# Altium PCB John_Main.PcbDoc (part 3 of 4)
Units mil, origin at the board's own origin, x right, y up, seen from the top; angles counter-clockwise.
Board outline 3346 x 2756 mil, 2 copper layers (Top Layer, Bottom Layer), stack 57 mil thick; 275 components, 161 nets, 721 pads, 395 vias.
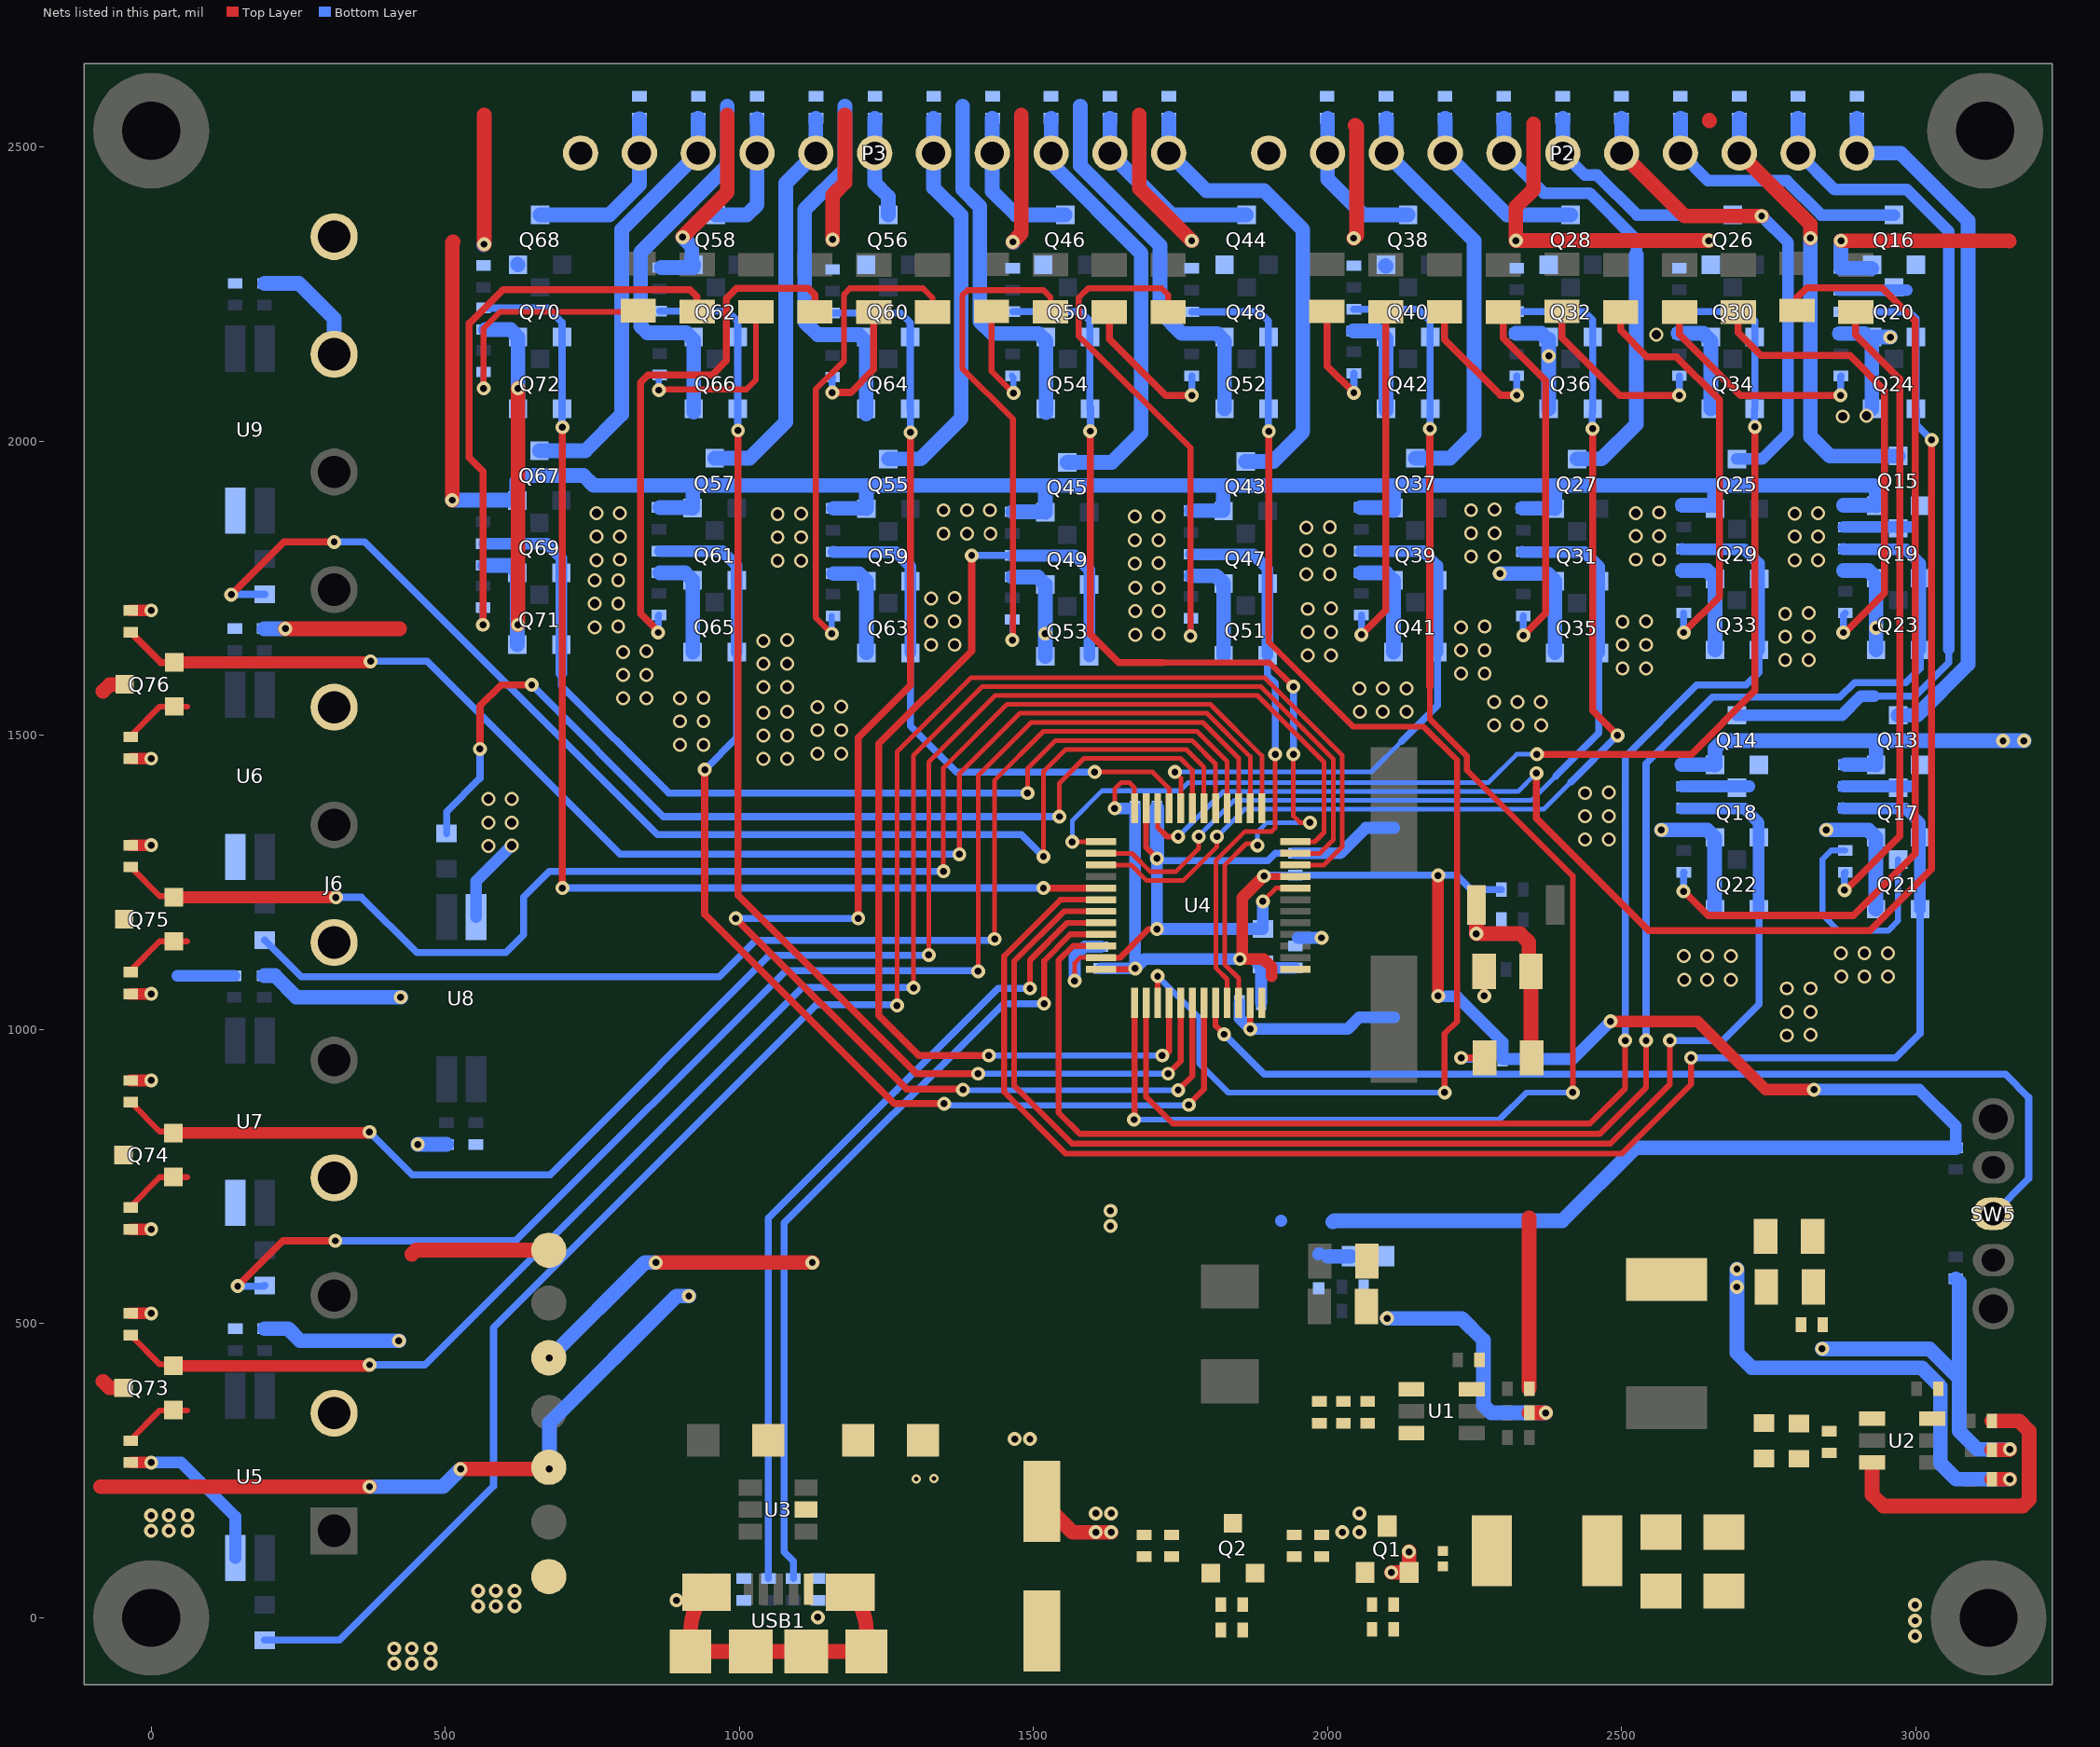
[diagram p2: the nets of this part, all layers, seen from the top]

## Part data (continued)
U3: "TVS DIODE 5VWM 10VC 6TSOP", Breakdown Voltage=7.5V, Case/Package=TSOP, Clamping Voltage=12V, LCSC Part Number=C393373, Leakage Current=1µA, MANUFACTURER=onsemi, Manufacturer Lifecycle Status=ACTIVE, Max Operating Temperature=125°C, Max Surge Current=19A, Min Breakdown Voltage=6V, Min Operating Temperature=-40°C, Operating Supply Voltage=5V, Peak Pulse Current=8A, Power Line Protection=Yes, Test Current=1mA, China RoHS=Compliant, ComponentLink1Description=https://datasheet.octopart.com:443/NUP2114UCMR6T1G-onsemi-datasheet-180968601.pdf?src-supplier=IHS, ComponentLink1URL=https://datasheet.octopart.com:443/NUP2114UCMR6T1G-onsemi-datasheet-180968601.pdf?src-supplier=IHS, ComponentLink2Description=https://datasheet.octopart.com:443/NUP2114UCMR6T1G-ON-Semiconductor-datasheet-139013348.pdf?src-supplier=Upverter, ComponentLink2URL=https://datasheet.octopart.com:443/NUP2114UCMR6T1G-ON-Semiconductor-datasheet-139013348.pdf?src-supplier=Upverter, ComponentLink3Description=https://datasheet.octopart.com:443/NUP2114UCMR6T1G-ON-Semiconductor-datasheet-12517220.pdf?src-supplier=JRH+Electronics, ComponentLink3URL=https://datasheet.octopart.com:443/NUP2114UCMR6T1G-ON-Semiconductor-datasheet-12517220.pdf?src-supplier=JRH+Electronics, ComponentLink4Description=https://datasheet.octopart.com:443/NUP2114UCMR6T1G-ON-Semiconductor-datasheet-93402670.pdf?src-supplier=Newark, ComponentLink4URL=https://datasheet.octopart.com:443/NUP2114UCMR6T1G-ON-Semiconductor-datasheet-93402670.pdf?src-supplier=Newark, ComponentLink5Description=https://datasheet.octopart.com:443/NUP2114UCMR6T1G-ON-Semiconductor-datasheet-11781058.pdf?src-supplier=Arrow+Electronics, ComponentLink5URL=https://datasheet.octopart.com:443/NUP2114UCMR6T1G-ON-Semiconductor-datasheet-11781058.pdf?src-supplier=Arrow+Electronics, ComponentLink6Description=http://sigma.octopart.com:80/15540786/rohs_certificate/ON-Semiconductor-NUP2114UCMR6T1G.pdf?src-supplier=Compliance+Statements, ComponentLink6URL=http://sigma.octopart.com:80/15540786/rohs_certificate/ON-Semiconductor-NUP2114UCMR6T1G.pdf?src-supplier=Compliance+Statements, ComponentLink7Description=http://sigma.octopart.com:80/15684254/materials_sheet/ON-Semiconductor-NUP2114UCMR6T1G.csv?src-supplier=Compliance+Statements, ComponentLink7URL=http://sigma.octopart.com:80/15684254/materials_sheet/ON-Semiconductor-NUP2114UCMR6T1G.csv?src-supplier=Compliance+Statements, ComponentLink8Description=http://sigma.octopart.com:80/150629776/rohs_statement/ON-Semiconductor-NUP2114UCMR6T1G.pdf?src-supplier=Compliance+Statements, ComponentLink8URL=http://sigma.octopart.com:80/150629776/rohs_statement/ON-Semiconductor-NUP2114UCMR6T1G.pdf?src-supplier=Compliance+Statements, ComponentLink9Description=http://sigma.octopart.com:80/reach_statement/ON-Semiconductor-company-79.pdf?src-supplier=Compliance+Statements, ComponentLink9URL=http://sigma.octopart.com:80/reach_statement/ON-Semiconductor-company-79.pdf?src-supplier=Compliance+Statements, ComponentLink10Description=https://octopart.com:443/opatz8j6/c1?t=WHQR9uYdgpzj_1pscu76jQl6SgdNYEFCsB45f32wZZoFxCsQNnTKjjNsMYmP8-tNAzH3PllWfDzCrm21sm3O0yX6Z-53NNC5eFJr5XbJGHdORXd5PF3OOo3CImUBKNeQS3HmN9uPOWjBWXFdunIc45LQOJ5gn3633PacQX-_VlsFFggQuFkNQdU_reWhDfM_aJjhbu9NdAkiBle4rEQKmYnaoI-ZpXvRqCCi0hGZ9pE0dY1iMvStjDVJm3RbKYgavDmI8RSqtgWwHOO5VIrlYvErgV0U4ccu7WiifKCK2DwQWrnPYcBzCgFR9XOWz9r3-48fB14U1Lqb5JaFbo5XHNFFjMaufSDK6ZmMxG1n87oH0pc&src-supplier=Compliance+Statements, ComponentLink10URL=https://octopart.com:443/opatz8j6/c1?t=WHQR9uYdgpzj_1pscu76jQl6SgdNYEFCsB45f32wZZoFxCsQNnTKjjNsMYmP8-tNAzH3PllWfDzCrm21sm3O0yX6Z-53NNC5eFJr5XbJGHdORXd5PF3OOo3CImUBKNeQS3HmN9uPOWjBWXFdunIc45LQOJ5gn3633PacQX-_VlsFFggQuFkNQdU_reWhDfM_aJjhbu9NdAkiBle4rEQKmYnaoI-ZpXvRqCCi0hGZ9pE0dY1iMvStjDVJm3RbKYgavDmI8RSqtgWwHOO5VIrlYvErgV0U4ccu7WiifKCK2DwQWrnPYcBzCgFR9XOWz9r3-48fB14U1Lqb5JaFbo5XHNFFjMaufSDK6ZmMxG1n87oH0pc&src-supplier=Compliance+Statements, ComponentLink11Description=https://octopart.com:443/opatz8j6/c1?t=VqVTyc6VXqTBoXsnuoG7LjY3mp2KX-eKzPIkg7aySNunBFpm0IQnkmc826qVFZhglS6vaf-VvqwaWaROfS_iErSVq9YUUuVgokCDv5Vhxq2pu1cn-vrRw1TlcFDaGbodQB-atNY6UP6gD2sOO8NRAoQTemD37mLChF1Rt1bpz95WWhJ_wI0XqbdDN8V1Apvbq8ufNLXwMMdHk5jYglIDCz4WpJf5DoTt1BP_MBv-tXAye_NcKa095654jMt3sjm_6RuC2vVrkcCpfXNjjgvjYPsYUvKBiXeM6Xjzw9honyCE0JlgCVT7WXyyf_6oP9kIrOXlSICGvfIO1US9YbBHujA-CLkGpoYI906K6Xw-TlpUog&src-supplier=Compliance+Statements, ComponentLink11URL=https://octopart.com:443/opatz8j6/c1?t=VqVTyc6VXqTBoXsnuoG7LjY3mp2KX-eKzPIkg7aySNunBFpm0IQnkmc826qVFZhglS6vaf-VvqwaWaROfS_iErSVq9YUUuVgokCDv5Vhxq2pu1cn-vrRw1TlcFDaGbodQB-atNY6UP6gD2sOO8NRAoQTemD37mLChF1Rt1bpz95WWhJ_wI0XqbdDN8V1Apvbq8ufNLXwMMdHk5jYglIDCz4WpJf5DoTt1BP_MBv-tXAye_NcKa095654jMt3sjm_6RuC2vVrkcCpfXNjjgvjYPsYUvKBiXeM6Xjzw9honyCE0JlgCVT7WXyyf_6oP9kIrOXlSICGvfIO1US9YbBHujA-CLkGpoYI906K6Xw-TlpUog&src-supplier=Compliance+Statements, Contact Plating=Tin, Depth=1.5mm, Direction=Unidirectional, Element Configuration=Single, ESD Protection=Yes, Halogen Free="Halogen Free", Height=1mm, Item Type="TVS Diodes", Lead Free="Lead Free", Length=3mm, Lifecycle Status=Production, Manufacturer Part Number=NUP2114UCMR6T1G, Max Breakdown Voltage=7.5V, Max Reverse Leakage Current=1µA, Number of Bidirectional Channels=2, Number of Channels=1, Number of Elements=1, Number of Lines=2, Number of Terminals=6, Packaging="Tape and Reel", Peak Reverse Current=1µA, Pins=6, Polarity=Unidirectional, Pricing="1=0.81, 10=0.5, 100=0.3234, 500=0.24708, 1000=0.22246 (USD)", Radiation Hardening=No, REACH SVHC=Yes, Reverse Standoff Voltage=5V, RoHS=Compliant, Schedule B="8536300000, 8536300000|8536300000|8536300000|8536300000|8536300000|8536300000|8536300000|8536300000|8536300000|8536300000|8536300000|8536300000|8536300000|8536300000|8536300000|8536300000|8536300000|8536300000|8536300000|8536300000|8536300000|8536300000|8536300000|85", Stock=34630, Supplier=DigiKey, Width=1.7mm, Working Voltage=5V
U4: "IC MCU 32BIT 128KB FLASH 48LQFP"
U5 U6 U7 U8 U9: "TransistorOptocouplers DC 1 2500Vrms SOP-4_P1.27 Optocouplers RoHS", Case/Package=SOIC, Collector Emitter Saturation Voltage=300mV, Forward Voltage=1.2V, MANUFACTURER=CEL, Max Collector Current=30mA, Max Operating Temperature=100°C, Max Output Voltage=80V, Max Power Dissipation=120mW, Min Operating Temperature=-55°C, Package Quantity=1, Supplier Part Number 1=PS2801C-1-F3-ACT-ND, Collector Emitter Voltage (VCEO)=300mV, ComponentLink1Description=http://www.cel.com/pdf/datasheets/PS2801C-1,PS2801C-4.pdf?src-supplier=Digi-Key, ComponentLink1URL=http://www.cel.com/pdf/datasheets/PS2801C-1,PS2801C-4.pdf?src-supplier=Digi-Key, ComponentLink2Description=http://www.cel.com/pdf/datasheets/how_to_order_optos.pdf?src-supplier=Digi-Key, ComponentLink2URL=http://www.cel.com/pdf/datasheets/how_to_order_optos.pdf?src-supplier=Digi-Key, ComponentLink3Description=http://datasheet.iiic.cc/cel/PS2801C-1-F3-A.pdf?src-supplier=IIIC, ComponentLink3URL=http://datasheet.iiic.cc/cel/PS2801C-1-F3-A.pdf?src-supplier=IIIC, Lead Free="Lead Free", Manufacturer Part Number=PS2801C-1-F3-A, Mount="Surface Mount", Number of Channels=1, Number of Pins=4, Output Current per Channel=30mA, Packaging="Tape and Reel", Pricing 1="1=0.77, 10=0.595, 100=0.3825 (USD)", Stock 1=399, Supplier 1=Digi-Key
USB1: library part "Micro Usb Conn SMD", "CONN USB MICRO B RECPT SMT R/A", Colour=Black, Current Rating=1.8A, Flammability Rating="UL94 V-0", Insulation Resistance=1GR, MANUFACTURER="Amphenol FCI", Max Operating Temperature=85°C, Max Voltage Rating (AC)=100V, Min Operating Temperature=-55°C, Package Quantity=1400, Supplier Part Number 1=609-4613-1-ND, ComponentLink1Description=https://datasheet.ciiva.com/26853/getdatasheetpartid-418041-26853891.pdf, ComponentLink1URL=https://datasheet.ciiva.com/26853/getdatasheetpartid-418041-26853891.pdf, ComponentLink2Description=https://datasheet.ciiva.com/851/10118192-851112.pdf, ComponentLink2URL=https://datasheet.ciiva.com/851/10118192-851112.pdf, ComponentLink3Description=https://datasheet.ciiva.com/4598/10118192ac-197249-4598796.pdf, ComponentLink3URL=https://datasheet.ciiva.com/4598/10118192ac-197249-4598796.pdf, Connector Type=USB,Receptacle, Contact Material="Copper Alloy", Contact Plating=Nickel,Gold, Depth=5.57mm, Gender=Receptacle, Housing Material=Polymer, Lead Free="Lead Free", Length=7.86mm, Manufacturer Part Number=10118192-0001LF, Mount="Surface Mount,Horizontal", Number of Contacts=5, Number of Ports=1, Number of Terminals=5, Orientation="Right Angle", Packaging="Tape and Reel", Pitch=0.65mm, Pricing 1="1=0.42, 10=0.393, 25=0.3536, 50=0.3144, 100=0.3013, 250=0.2751, 500=0.262 (USD)", Radiation Hardening=No, REACH SVHC="No SVHC", Stock 1=203283, Supplier 1=Digi-Key, Termination=Solder, USB Standard="USB 2.0", Voltage Rating=100V
X1: "8MHz ±20ppm 20pF SMD,12.5x4.5mm SMD Crystal Resonators RoHS", MANUFACTURER="Suzhou Liming Elec", Package=Custom, Manufacturer Part No=49MD-8.000-20-20-20/A
J1 J2 J3 J4 J5 J7 J8: LatestRevisionDate=17-Jul-2002, LatestRevisionNote="Re-released for DXP Platform.", Publisher="Altium Limited"

## Free pads (board coordinates)
  round 196.85 hole 98.43: MH(0,2528) MH(0,0) MH(3118,2528) MH(3124,0)

## Via types
v1: diameter 23.62, hole 11.81, Top Layer to Bottom Layer, tented both sides, 228 vias
v2: diameter 23.62, hole 15.75, Top Layer to Bottom Layer, tented both sides, 165 vias
v3: diameter 15.75, hole 7.87, Top Layer to Bottom Layer, 2 vias

## Nets (pads, with @x,y where several pads share a name; then routed paths per layer and width w, separated by ;. In a path a pad name is that pad's centre, name@x,y a point inside that pad or via, vN(x,y) a via of type N, cw(c..) or ccw(c..) an arc to the next point about the centre after c; other vN are vias at no path point)
5V: CF6.1 CF7.1 CF8.1 D1.A LF1.2 Q13.2 Q14.2 Q15.2 Q16.2 Q25.2 Q26.2 Q27.2 Q28.2 Q37.2 Q38.2 Q43.2 Q44.2 Q45.2 Q46.2 Q55.2 Q56.2 Q57.2 Q58.2 Q67.2 Q68.2 R59.2 R60.2 R61.2 R62.2 R71.2 R72.2 R73.2 R74.2 R83.2 R84.2 R90.2 R91.2 R92.2 R93.2 R102.2 R103.2 R104.2 R105.2 R114.2 R115.2 RF2.1 | length 7554.3
  Top Layer w25: v1(511.78,1900) 511.78,2337.78 513,2339 ; v1(566,2335) 566,2555 ; v1(903.48,2347.23) 979.5,2423.25 979.5,2555 ; v1(1158.49,2343) 1158.49,2418.49 1179.5,2439.5 1179.5,2555 ; v1(1465,2339) 1479.5,2353.5 1479.5,2555 ; 1680,2555 1680,2430 v1(1769,2341) ; v1(2044.56,2345.32) 2049.5,2350.27 2049.5,2534.5 2047,2537 ; 2350,2540 2350,2428.19 2320.19,2398.38 v1(2320.19,2341.32) v1(2648.05,2341.32) ; 2649,2546 2649,2545.55 2649.5,2545.05 ; v1(2872.78,2341) 3158,2341 3159,2340 ; RF2.1@3129.45,235.68 v1(3159.94,235.68)
  Bottom Layer w25: v1@511.78,1900.18 R114.2@564.37,1900.18 ; v1@565.09,2334.09 v1(566,2335) ; R114.2@566.99,1900.18 621.78,1900.18 621.78,1932.68 631.09,1942 735,1942 752,1925 924,1925 ; Q68.2@622.87,2301 Q68.2@623.69,2300.18 ; R104.2@865,1887.5 919.78,1887.5 Q57.2@920.6,1886.68 920.6,1921.6 924,1925 ; R105.2@866.76,2295.5 Q58.2@921.54,2295.5 ; v1(903.48,2347.23) 919.11,2331.59 919.11,2303.43 Q58.2@922.36,2300.18 ; R102.2@1160.43,1886.18 1215.21,1886.18 Q55.2@1216.03,1885.36 1216.03,1920.97 1212,1925 ; R92.2@1464.52,1880.26 1519.3,1880.26 Q45.2@1520.12,1879.44 1520.12,1922.12 1523,1925 ; v1(1465,2339) v1@1465.61,2338.39 ; R90.2@1767.61,1882.17 R90.2@1767.96,1882.17 1822.39,1882.17 1822.39,1925 ; v1(1769,2341) v1@1769.17,2340.83 ; R83.2@2056.45,1887.5 R83.2@2057.55,1887.5 2111.23,1887.5 Q37.2@2112.06,1886.67 ; Q38.2@2098.78,2298.5 Q38.2@2099.6,2297.67 ; Q37.2@2112.23,1882.5 2112.23,1920.97 ; R73.2@2330.99,1886.18 R73.2@2332.83,1886.18 2385.78,1886.18 Q27.2@2386.6,1885.35 ; Q27.2@2386.03,1887.36 2386.03,1922.97 ; R60.2@2602.49,1450.5 R60.2@2605.58,1450.5 2657.27,1450.5 Q14.2@2658.09,1449.67 ; R71.2@2602.99,1891.18 R71.2@2605.58,1891.18 2658.12,1891.18 2658.12,1924.12 ; Q14.2@2658.6,1449.67 2658.6,1477.54 2672.06,1491 2936,1491 ; 2696.01,450.44 v1(2696.01,592.77) ; 2697.69,448.73 2721.42,425 3010.44,425 3041.94,393.5 3041.94,262.5 3068.76,235.68 v1(3159.94,235.68) ; v1@2872.95,2340.84 R62.2@2872.95,2294.18 2924.78,2294.18 Q16.2@2925.6,2293.35 ; R61.2@2876.99,1891.18 R61.2@2880.32,1891.18 2931.78,1891.18 Q15.2@2932.6,1890.35 2932.6,1920.4 2928,1925 2095.14,1925 1822.39,1925 ; R59.2@2880.32,1450.5 2931.27,1450.5 Q13.2@2932.09,1449.67 ; Q13.2@2932.6,1449.67 2932.6,1487.6 2936,1491 ; v1(3184,1491) 2936,1491 ; 924,1925 1212,1925 ; 1212,1925 1523,1925 ; 1523,1925 1692,1925 1822.39,1925
  other v1: 2695.88,562.5 3148.46,1491
  other v3: 1300.62,236.3 1331,237
12V: C15.2 C16.2 CF2.1 CF3.1 CF4.1 F1.2 RF10.2 U2.3 | length 521.8
  Top Layer w25: U2.3@2925.76,264.1 2925.76,209.24 2945,190 3182,190 3193,201 3193,317.5 3175.82,334.68 RF10.2@3129.45,334.68
12V_IN: C11.1 C12.2 C13.2 J6.11 J7.1 Q1.2 Q2.3 R6.1 R7.1 R11.2 R15.2 R18.2 R23.2 R24.2 | length 1407.7
  Top Layer w25: v1(228,1681.5) 422.5,1681.5 ; 443,618 450,625 J7.1@676,625 ; C11.1@1514.1,198.04 1566.64,145.5 v1(1632,145.5) ; v1(2108.47,77.13) Q1.2@2138.5,77.13 v1(2138.5,112.4)
  Bottom Layer w25: R15.2@192,1091.69 210.31,1091.69 247,1055 v1(424.24,1055) ; R18.2@192.38,1681.5 v1(228,1681.5) ; R24.2@192.52,2268.52 250.98,2268.52 311,2208.5 J6.11@311,2148 ; R11.2@193,491.5 232.77,491.5 253.27,471 v1(421,471) ; v1(453.21,804.79) R23.2@502.12,804.79
  other v1: 413,-78 443,-78 475,-78 413,-52 443,-52 475,-52 1606,145.5 2025.1,145.5 2054.1,145.5 1606,177.5 1632,177.5 2054.1,177.5
BOOT0#: SW5.2 U4.44 | length 1694.9
  Top Layer w10: U4.44@1809.53,1045.65 1809.53,1006.47 v1(1824,992)
  Bottom Layer w12: v1(1824,992) 1892,924 3153,924 3192,885 3192,746.92 SW5.2@3132,686.92
DM: C34.1 R16.1 U4.32 | length 1414
  Top Layer w10: v1(1494,1070) 1494,1118 1557.47,1181.47 U4.32@1614.65,1181.47
  Bottom Layer w12: R16.1@1049.36,66.82 1049.36,679.36 1251.19,881.19 1251.28,881.19 1265.81,895.72 1265.81,895.81 1440,1070 v1(1494,1070)
DP: C35.1 R17.1 U4.33 | length 1395.2
  Top Layer w10: v1(1518,1044) 1518,1117.04 1562.75,1161.79 U4.33@1614.65,1161.79
  Bottom Layer w12: R17.1@1092.03,66.82 1092.03,96.24 1076.36,111.9 1076.36,671.36 1449,1044 v1(1518,1044)
GND: C1.2 C8.2 C9.1 C10.2 C11.2 C12.1 C15.1 C16.1 C17.1 C23.2 C25.1 C32.2 C33.2 C34.2 C35.2 CF1.2 CF2.2 CF3.2 CF4.2 CF6.2 CF7.2 CF8.2 CS1.1 CU1.2 CU2.2 CU3.2 CU4.2 CU5.2 CU6.2 CU7.2 CU8.1 CU9.1 CU10.1 J5.1 J6.12 LED1.2 LED2.2 P2.11 P3.11 Q17.2 Q18.2 Q19.2 Q20.2 Q21.2 Q22.2 Q23.2 Q24.2 Q29.2 Q30.2 Q31.2 Q32.2 Q33.2 Q34.2 Q35.2 Q36.2 Q39.2 Q40.2 Q41.2 Q42.2 Q47.2 Q48.2 Q49.2 Q50.2 Q51.2 Q52.2 Q53.2 Q54.2 Q59.2 Q60.2 Q61.2 Q62.2 Q63.2 Q64.2 Q65.2 Q66.2 Q69.2 Q70.2 Q71.2 Q72.2 R4.1 R9.2 R10.1 R12.1 R19.1 R20.1 R25.1 R26.1 R38.1 R46.1 R48.1 R50.1 R63.2 R64.2 R65.2 R66.2 R75.2 R76.2 R77.2 R78.2 R85.2 R86.2 R94.2 R95.2 R96.2 R97.2 R106.2 R107.2 R108.2 R109.2 R116.2 R117.2 R120.2 R121.2 R122.2 R123.2 RF3.1 RP1.1 RP2.1 RP3.1 RP4.1 RP5.1 RP6.1 RP7.1 RP8.1 RP9.1 RP10.1 RP11.1 RP12.1 RP13.1 RP14.1 RP15.1 RP16.1 RP17.1 RP18.1 RP19.1 RP20.1 RU3.2 SW4.1 U1.1 U2.1 U3.2 U4.8 U4.23 U4.35 U4.47 U5.2 U6.2 U7.2 U8.2 U9.2 USB1.5 USB1.MP1 USB1.MP2 USB1.MP3 USB1.MP4 USB1.MP5 USB1.MP6 | length 10404.7
  Top Layer w8: v1(1570,1083) 1570,1113 1579.42,1122.42 U4.35@1614.65,1122.42 ; v1(1890,1218) 1912.53,1240.53 U4.8@1945.35,1240.53
  Top Layer w10: U4.35@1614.65,1122.42 1615.06,1122 1646.96,1122 1695.96,1171 v1(1710,1171) ; U4.23@1691.42,1376.35 1691.42,1309.58 v1(1710,1291) ; v1(1868.58,1001) U4.47@1868.58,1045.65
  Top Layer w20: R120.2@-35,264 -0.1,264 v1(0,264.1) ; R38.1@-35,517.5 v1@-0.1,517.5 ; R121.2@-35,660.5 v1@-0.1,660.5 ; R46.1@-35,913.5 v1@-0.1,913.5 ; R122.2@-35,1060.5 v1@-0.1,1060.5 ; R48.1@-35,1313.5 v1@-0.1,1313.5 ; R123.2@-35,1460.5 v1@-0.1,1460.5 ; R50.1@-35,1712.5 v1@-0.1,1712.5
  Top Layer w25: v1(623.69,1688) v1(623.69,2090) ; USB1.MP1@944.39,43.39 ccw(c1010.92,-23.14) 916.83,-23.14 USB1.MP6@916.83,-57 USB1.MP5@1019.19,-57 USB1.MP4@1113.68,-57 USB1.MP3@1216.04,-57 1216.04,-23.14 ccw(c1121.95,-23.14) USB1.MP2@1188.48,43.39 ; SW4.1@2253.07,1212 2253,1211.93 v1(2253,1163) 2327.68,1163 2342.32,1148.36 2342.32,1106.68 LED2.2@2346,1103 ; R4.1@2342.81,348.5 v1(2370.94,348.5) ; LED2.2@2346,1099 2346,953 LED1.2@2347,952 ; RF3.1@3129.45,285.68 3159.12,285.68 v1(3159.94,286.5)
  Bottom Layer w12: v1@1709.92,1291.08 v1(1710,1291) 1714,1287 1898.68,1287 1911.26,1299.58 CU7.2@1945.35,1299.58
  Bottom Layer w20: v1(0,264.1) 50.9,264.1 143,172 U5.2@143,102 ; 44.31,1091.69 R20.1@141,1091.69 ; U8.2@552.12,1191.29 552.12,1252.12 v2(613,1313) ; v1(1570,1083) 1570,1124 1586.92,1140.92 CU2.2@1614.65,1140.92 ; v1@1710,1173 v1(1710,1291) ; v1@1712,1171 CU5.2@1890,1171 v1(1890,1218) ; CU3.2@1850.08,1045.65 1850.08,1019.5 v1(1868.58,1001) 2034,1001 2053.98,1020.98 CU9.1@2113,1020.98 ; CU7.2@1945.35,1299.58 2021.58,1299.58 2064.99,1342.99 CU10.1@2113,1342.99 ; 1949,1156 v1(1990,1156)
  Bottom Layer w25: R116.2@566.99,1789.18 609.78,1789.18 Q69.2@622.6,1776.35 Q71.2@622.6,1654.35 ; R117.2@568.09,2190 610.87,2190 Q70.2@623.69,2177.18 v1(623.69,2090) Q72.2@623.69,2055.18 ; R108.2@865,1776.5 907.78,1776.5 Q61.2@920.6,1763.68 Q65.2@920.6,1641.68 ; Q66.2@922.36,2049.67 Q66.2@922.36,2055.18 922.36,2171.67 909.54,2184.5 R109.2@864.5,2184.5 843.5,2184.5 832,2196 832,2321 979.5,2468.5 979.5,2570 ; R106.2@1160.43,1775.18 1203.21,1775.18 Q59.2@1216.03,1762.36 Q63.2@1216.03,1640.36 ; 1179.5,2570 1179.5,2462.5 1111,2394 1111,2203.33 1133.16,2181.18 R107.2@1158.48,2181.18 1202.78,2181.18 1215.6,2168.35 Q64.2@1215.6,2055.18 Q64.2@1215.6,2046.35 ; 1379.5,2570 1379.5,2428.5 1409,2399 1409,2204 1429.74,2183.26 R97.2@1464.84,2183.26 ; R96.2@1464.52,1769.26 1507.3,1769.26 Q49.2@1520.12,1756.44 v1(1520.12,1673) Q53.2@1520.12,1634.44 ; R97.2@1465.61,2183.26 1508.39,2183.26 1521.21,2170.44 Q54.2@1521.21,2055.18 Q54.2@1521.21,2048.44 ; 1579.5,2570 1579.5,2468.5 1715,2333 1715,2220 1751.83,2183.17 R95.2@1769.17,2183.17 ; v1@1709.92,1291.08 CU1.2@1709.92,1327 CU6.2@1709.92,1376.35 ; R94.2@1767.61,1771.17 R94.2@1767.96,1771.17 1810.39,1771.17 Q47.2@1823.21,1758.35 Q51.2@1823.21,1636.35 ; R95.2@1769.17,2183.17 1811.97,2183.17 1824.79,2170.35 Q52.2@1824.79,2055.18 ; R86.2@2044,2187.5 R86.2@2044.72,2187.5 2086.78,2187.5 2099.6,2174.67 Q42.2@2099.6,2055.18 Q42.2@2099.6,2052.67 ; R85.2@2056.45,1776.5 R85.2@2057.55,1776.5 2099.23,1776.5 Q39.2@2112.06,1763.67 Q41.2@2112.06,1641.67 ; v1(2101.25,509.19) 2228.09,509.19 2264.94,472.33 2264.94,361.5 2277.94,348.5 v1(2370.94,348.5) ; v1(2293,1775.18) R77.2@2332.83,1775.18 2373.78,1775.18 Q31.2@2386.6,1762.35 Q35.2@2386.6,1640.35 ; R78.2@2320.36,2183.5 R78.2@2321.82,2183.5 2363.14,2183.5 Q32.2@2372.71,2173.93 ; Q36.2@2375.96,2055.18 v1(2375.96,2145) Q32.2@2375.96,2173.93 ; v1(2567.5,1339.5) R64.2@2605.58,1339.5 2645.27,1339.5 2658.09,1326.67 Q22.2@2658.09,1204.67 ; R76.2@2596,2183.5 R76.2@2598.21,2183.5 2638.79,2183.5 2651.61,2170.67 Q34.2@2651.61,2055.18 ; R75.2@2602.99,1780.18 R75.2@2605.58,1780.18 2645.78,1780.18 2658.6,1767.35 Q33.2@2658.6,1645.35 ; v1(2840.94,457.5) 2841.44,457 3023.7,457 3073.94,406.75 ; v1(2848,1339.5) R63.2@2880.32,1339.5 2919.27,1339.5 2932.09,1326.67 Q21.2@2932.09,1204.67 ; R66.2@2869.99,2183.18 R66.2@2872.95,2183.18 2912.78,2183.18 2925.6,2170.35 Q24.2@2925.6,2055.18 ; R65.2@2876.99,1780.18 R65.2@2880.32,1780.18 2919.78,1780.18 Q19.2@2932.6,1767.35 v1(2932.6,1683) Q23.2@2932.6,1645.35 ; Q20.2@2925.6,2177.18 v1@2956.82,2177.18 ; RU3.2@3068,576.5 3073.94,570.56 3073.94,406.75 ; v1(3159.94,286.5) 3104.94,286.5 3073.94,317.5 3073.94,406.75
  other v1: 2999,-31.12 2999,-4.8 1133.36,1 555.9,20 585.9,20 617.9,20 2999,22 893,29.82 555.9,46 585.9,46 617.9,46 -0.1,148 29.9,148 61.9,148 -0.1,174 29.9,174 61.9,174 0,517.6 0,660.6 0,913.6 0,1060.6 0,1313.6 0,1460.6 0,1712.6 2957,2177
  other v2: 2781,990 2821,991 2781,1030 2821,1030 2781,1070 2821,1070 2606.58,1085 2645.58,1085 2685.58,1085 2873.78,1090 2912.78,1090 2952.78,1090 2605.58,1125 2645.58,1125 2685.58,1125 2872.78,1130 2912.78,1130 2952.78,1130 573,1312 2438,1323 2478,1323 573,1352 613,1352 2438,1363 2478,1363 573,1392 613,1392 2438,1402 2478,1403 1041,1460 1081,1460 1133,1469 1173,1469 899,1484 939,1484 1041,1500 1081,1500 1133,1509 1173,1509 2283.14,1517 2323.14,1517 2363.14,1517 899,1524 939,1524 1041,1539 1081,1540 2055.1,1540 2094.1,1540 2134.1,1540 1133,1548 1173,1549 2283.14,1557 2323.14,1557 2362.14,1557 802,1563 842,1563 899,1563 939,1564 2054.1,1580 2094.1,1580 2134.1,1580 1041,1582 1081,1582 802,1603 842,1603 2227,1605 2267,1605 2501.5,1614 2541.5,1614 1041,1622 1081,1622 2778,1628 2818,1628 1966,1636 2006,1636 802,1642 842,1643 2227,1645 2267,1645 1326,1654 1366,1654 2501.5,1654 2541.5,1654 1041,1661 1081,1662 2778,1668 2818,1668 1673,1671.32 1713,1672.32 1966,1676 2006,1676 754,1684 2227,1684 794,1685 2267,1685 2501.5,1693 1326,1694 1366,1694 2541.5,1694 2778,1707 2818,1708 1673,1711.32 1713,1711.32 1966,1715 2006,1716 754,1724 794,1724 1326,1733 1366,1734 1673,1751.32 1713,1751.32 754,1764 794,1764 1963.94,1774.18 2003.94,1774.18 1672.56,1792 1712.56,1793 1065,1797 1105,1797 757,1798 2794,1798 2834,1798 797,1799 2524,1799 2564,1799 2244,1804 2284,1804 1963.94,1814.18 2003.94,1814.18 1672.56,1832 1712.56,1832 1065,1837 1105,1837 757,1838 797,1838 2794,1838 2834,1838 2524,1839 2564,1839 1347,1843 1387,1843 1427,1843 2244,1844 2284,1844 1963.94,1853.18 2003.94,1854.18 1672.56,1872 1712.56,1872 1065,1876 1105,1877 2794,1877 757,1878 797,1878 2524,1878 2834,1878 2564,1879 1347,1883 1387,1883 1426,1883 2244,1883 2284,1884 2876,2042.27 2916,2043.27 2558.81,2181.26
GPIOH0_O: Q73.2 R38.2 U4.11 | length 3060.2
  Top Layer w8: v1(1296,1071) 1296,1466 1413,1583 1886.79,1583 2010,1459.79 2010,1323 1986.58,1299.58 U4.11@1945.35,1299.58
  Top Layer w10: R38.2@-35,480.5 14.5,431 61,431
  Top Layer w20: Q73.2@37.82,428.4 v1@371.28,428.4
  Bottom Layer w12: v1(371.28,430.17) 465.17,430.17 1106.6,1071.6 1295.4,1071.6 v1(1296,1071)
GPIOH0_O#: J6.2 Q73.1 R120.1 | length 116.5
  Top Layer w10: R120.1@-35,303 14.5,352.5 61,352.5
GPIOH1_O: Q74.2 R46.2 U4.12 | length 2854.4
  Top Layer w8: v1(1322,1127) 1322,1455 1435,1568 1880.57,1568 1994,1454.57 1994,1335 1978.27,1319.27 U4.12@1945.35,1319.27
  Top Layer w10: R46.2@-35,876.5 14.5,827 61,827
  Top Layer w20: Q74.2@37.68,824.22 v1@371.13,824.22
  Bottom Layer w12: v1(371.13,826) 444.03,753.1 678.1,753.1 1051,1126 1321,1126 v1(1322,1127)
GPIOH1_O#: J6.4 Q74.1 R121.1 | length 116.5
  Top Layer w10: R121.1@-35,699.5 14.5,749 61,749
GPIOH2_O: Q75.2 R48.2 U4.13 | length 2447.9
  Top Layer w8: v1(1347,1269) 1347,1445 1455,1553 1800.74,1553 1888.27,1465.47 U4.13@1888.27,1376.35
  Top Layer w10: R48.2@-35,1276.5 14.5,1227 61,1227
  Top Layer w20: Q75.2@38.69,1224.89 v1(313.89,1224.89)
  Bottom Layer w12: v1(313.89,1224.89) 357.6,1224.89 451.5,1131 603,1131 633,1161 633,1225 677,1269 v1(1347,1269) v1@1345.5,1267.5
GPIOH2_O#: J6.6 Q75.1 R122.1 | length 116.5
  Top Layer w10: R122.1@-35,1100.5 14.5,1150 61,1150
GPIOH3_O: Q76.2 R50.2 U4.14 | length 2358.6
  Top Layer w8: v1(1374,1298) 1374,1435 1477,1538 1794.53,1538 1868.58,1463.94 U4.14@1868.58,1376.35
  Top Layer w12: R50.2@-35,1675.5 16.28,1624.22 Q76.2@39.55,1624.22
  Top Layer w20: Q76.2@39.55,1624.22 v1@373,1624.22
  Bottom Layer w12: v1(373,1626) 469,1626 797,1298 v1(1374,1298)
GPIOH3_O#: J6.8 Q76.1 R123.1 | length 116.5
  Top Layer w10: R123.1@-35,1499.5 14.5,1549 61,1549
GPIOY0_O: R5.2 U4.10 | length 3222.7
  Top Layer w8: v1(1268,1041) 1268,1472 1394,1598 1893,1598 2025,1466 2025,1311 1993.9,1279.9 U4.10@1945.35,1279.9
  Bottom Layer w12: R5.2@193,-38 320,-38 582,224 582,493 1131,1042 1267,1042 v1(1268,1041)
GPIOY1_O: R13.2 U4.15 | length 2451.1
  Top Layer w8: v1(1406,1099) 1406,1432 1496,1522 1788,1522 1848.9,1461.1 U4.15@1848.9,1376.35
  Top Layer w12: v1(147,564) 224,641 v1(313,641)
  Bottom Layer w12: v1(147,564) 191.81,564 R13.2@193,565.19 ; v1(313,641) 620,641 1079,1100 1405,1100 v1(1406,1099)
GPIOY2_O: R14.2 U4.16 | length 2093.4
  Top Layer w8: v1(1434,1154) 1434,1424 1517,1507 1778,1507 1829.21,1455.79 U4.16@1829.21,1376.35
  Bottom Layer w12: R14.2@193,1152 255,1090 965.54,1090 1027.35,1151.81 1431.81,1151.81 v1(1434,1154)
GPIOY3_O: R22.2 U4.18 | length 2212.4
  Top Layer w8: v1(1517,1294) 1517,1438.44 1554.56,1476 1760,1476 1789.84,1446.16 U4.18@1789.84,1376.35
  Top Layer w12: v1(136,1739.22) 225.78,1829 v1(311,1829)
  Bottom Layer w12: v1(136,1739.22) 136.8,1740.02 R22.2@193,1740.02 ; v1(311,1829) 363,1829 860.21,1331.79 1479.21,1331.79 v1(1517,1294) v1@1516.81,1293.81
GPIOY4_O: R21.2 U4.19 | length 1706.5
  Top Layer w8: v1(1544.14,1362) 1544.14,1419.14 1586,1461 1750,1461 1770.16,1440.84 U4.19@1770.16,1376.35
  Top Layer w12: v1(559,1477) 559,1550.09 594.91,1586 v1(647,1586)
  Bottom Layer w12: R21.2@502.12,1333.29 502.12,1370.12 559,1427 v1(559,1477) ; v1(647,1586) 871,1362 v1(1544.14,1362)
LED_CON_11: P2.1 Q13.3 RP1.2 | length 1205
  Bottom Layer w25: RP1.2@2900,2549.5 P2.1@2900,2490 2974,2490 3089,2375 3089,1621 3002.32,1534.32 Q13.3@2970,1534.32
LED_CON_12: P2.2 Q14.3 RP2.2 | length 1500.7
  Bottom Layer w12: 2929,1567 2998.94,1567 3056,1624.06 3056,1647
  Bottom Layer w20: Q14.3@2696,1534.32 2874.32,1534.32 2907,1567 2929,1567 ; P2.2@2800,2490 2862,2428 2985,2428 3056,2357 3056,1647
  Bottom Layer w25: P2.2@2800,2490 RP2.2@2800,2549.5
LED_CON_13: P2.3 Q15.3 RP3.2 | length 754.3
  Top Layer w25: P2.3@2700,2490 2821,2369 v1(2821,2345.53)
  Bottom Layer w25: P2.3@2700,2490 RP3.2@2700,2549.5 ; v1(2821,2345.53) 2821,2008 2854,1975 Q15.3@2970,1975
LED_CON_14: P2.4 Q16.3 RP4.2 | length 466.1
  Bottom Layer w20: P2.4@2600,2490 2647,2443 2781,2443 2839.18,2384.82 Q16.3@2963,2384.82
  Bottom Layer w25: P2.4@2600,2490 RP4.2@2600,2549.5
LED_CON_15: P2.5 Q25.3 RP5.2 | length 834.7
  Top Layer w25: P2.5@2500,2490 2607,2383 v1(2738,2383)
  Bottom Layer w20: Q25.3@2696,1970 2739,1970 2783,2014 2783,2338 v1(2738,2383)
  Bottom Layer w25: P2.5@2500,2490 RP5.2@2500,2549.5
LED_CON_21: P2.6 Q26.3 RP6.2 | length 392.1
  Bottom Layer w20: P2.6@2400,2490 2437.5,2452.5 2458.5,2452.5 2526.18,2384.82 Q26.3@2689.01,2384.82
  Bottom Layer w25: P2.6@2400,2490 RP6.2@2400,2549.5
LED_CON_22: P2.7 Q27.3 RP7.2 | length 784.5
  Bottom Layer w20: P2.7@2300,2490 2368,2422 2445.5,2422 2525,2342.5 2525,2317
  Bottom Layer w25: P2.7@2300,2490 RP7.2@2300,2549.5 ; Q27.3@2424,1970 2466,1970 2525,2029 2525,2317
LED_CON_23: P2.8 Q28.3 RP8.2 | length 316.4
  Bottom Layer w25: RP8.2@2200,2549.5 P2.8@2200,2490 2305.18,2384.82 Q28.3@2413.36,2384.82
LED_CON_24: P2.9 Q37.3 RP9.2 | length 715.5
  Bottom Layer w25: RP9.2@2100,2549.5 P2.9@2100,2490 2249,2341 2249,2012.15 2208.17,1971.32 Q37.3@2149.46,1971.32
LED_CON_25: P2.10 Q38.3 RP10.2 | length 265.8
  Bottom Layer w25: RP10.2@2000,2549.5 P2.10@2000,2490 2000,2446 2061.18,2384.82 Q38.3@2137.01,2384.82
LED_CON_31: P3.1 Q43.3 RP11.2 | length 803.4
  Bottom Layer w25: RP11.2@1730,2549.5 P3.1@1730,2490 1794,2426 1892,2426 1958,2360 1958,2016 1908,1966 Q43.3@1860.62,1966
LED_CON_32: P3.2 Q44.3 RP12.2 | length 335.3
  Bottom Layer w25: RP12.2@1629.89,2549.5 1630,2549.39 P3.2@1630,2490 1735.18,2384.82 Q44.3@1862.2,2384.82
LED_CON_33: P3.3 Q45.3 RP13.2 | length 744.8
  Bottom Layer w25: RP13.2@1530,2549.28 P3.3@1530,2490 1530,2472.75 1683,2319.75 1683,2014 1633.08,1964.08 Q45.3@1557.52,1964.08
LED_CON_34: P3.4 Q46.3 RP14.2 | length 264.8
  Bottom Layer w25: RP14.2@1430,2549.17 P3.4@1430,2490 1430,2425 1470.18,2384.82 Q46.3@1554.01,2384.82
LED_CON_35: P3.5 Q55.3 RP15.2 | length 681.7
  Bottom Layer w25: Q55.3@1253.43,1970 1308,1970 1377,2039 1377,2384 1330,2431 P3.5@1330,2490 RP15.2@1330,2549.06
LED_CON_41: P3.6 Q56.3 RP16.2 | length 173.6
  Bottom Layer w25: RP16.2@1230,2548.94 P3.6@1230,2490 1230,2439 1253,2416 Q56.3@1253,2384.82
LED_CON_42: P3.7 Q57.3 RP17.2 | length 683.5
  Bottom Layer w25: Q57.3@958.01,1971.32 1017.32,1971.32 1079,2033 1079,2439 P3.7@1130,2490 RP17.2@1130,2548.83
LED_CON_43: P3.8 Q58.3 RP18.2 | length 224.1
  Bottom Layer w25: Q58.3@959.76,2384.82 1012.82,2384.82 1030,2402 P3.8@1030,2490 RP18.2@1030,2548.72
LED_CON_44: P3.9 Q67.3 RP19.2 | length 723
  Bottom Layer w25: Q67.3@660,1984 738,1984 800,2046 800,2360 P3.9@930,2490 RP19.2@930,2549.5
LED_CON_45: P3.10 Q68.3 RP20.2 | length 302.6
  Bottom Layer w25: Q68.3@661.09,2384.82 778.82,2384.82 830,2436 P3.10@830,2490 RP20.2@830,2548.5
LED_GPIO_11: Q17.1 Q21.1 R63.1 U4.30 | length 2646.5
  Top Layer w10: U4.30@1614.65,1220.84 1545.84,1220.84 1450,1125 1450,894.03 1555.03,789 2500,789 2618,907 v1(2618,952)
  Bottom Layer w12: v1(2618,952) 2966,952 3007.4,993.4 Q21.1@3007.4,1204.67
  Bottom Layer w20: R63.1@2876.49,1376.5 2876.49,1376 2982.49,1376 3006.9,1351.59 Q21.1@3006.9,1204.67
LED_GPIO_12: Q18.1 Q22.1 R64.1 U4.31 | length 2292
  Top Layer w10: U4.31@1614.65,1201.16 1552.16,1201.16 1467,1116 1467,905 1566,806 2481,806 2582,907 v1(2582,981.5)
  Bottom Layer w12: v1(2582,981.5) 2671.5,981.5 2733.4,1043.4 Q22.1@2733.4,1204.67
  Bottom Layer w20: R64.1@2602.49,1376 2708.49,1376 2732.9,1351.59 Q22.1@2732.9,1204.67
LED_GPIO_13: Q19.1 Q23.1 R65.1 U4.34 | length 2789.4
  Top Layer w10: U4.34@1614.65,1142.1 1567.1,1142.1 1543,1118 1543,858.73 1578.73,823 2463,823 2541.5,901.5 v1(2541.5,981.5)
  Bottom Layer w12: v1(2541.5,981.5) 2541.5,1451.69 2654.81,1565 2871,1565 2896,1590 2983.47,1590 3007.4,1613.93 Q23.1@3007.4,1645.35
  Bottom Layer w20: R65.1@2876.99,1817.18 2876.99,1816.68 2982.99,1816.68 3007.4,1792.27 Q19.1@3007.4,1767.35 Q23.1@3007.4,1645.35
LED_GPIO_14: Q20.1 Q24.1 R66.1 U4.22 | length 2668.4
  Top Layer w8: U4.22@1711.1,1376.35 1711.1,1343.9 1720,1335
  Top Layer w10: 1720,1335 1727,1328 v1(1746,1328)
  Top Layer w12: v1@2355,1427 2355,1359.3 2545.81,1168.5 2922.5,1168.5 3027,1273 v1(3027,2002.5)
  Bottom Layer w8: v1(1746,1328) 1822.81,1404.81 2323.81,1404.81 v1(2355,1436)
  Bottom Layer w12: R66.1@2872.95,2220.18 2988.63,2220.18 3000.4,2208.4 Q20.1@3000.4,2177.18 Q24.1@3000.4,2055.18 3001.04,2054.54 3001.04,2028.46 v1(3027,2002.5)
LED_GPIO_15: Q29.1 Q33.1 R75.1 U4.38 | length 2195.2
  Top Layer w10: U4.38@1691.42,1045.65 1691.42,885.58 1737,840 2446,840 2506,900 v1(2506,981.5)
  Bottom Layer w12: v1(2506,981.5) 2506,1464.19 2627.43,1585.62 2711.62,1585.62 2733.4,1607.4 Q33.1@2733.4,1645.35
  Bottom Layer w20: R75.1@2602.99,1817.18 2602.99,1816.68 2708.99,1816.68 2733.4,1792.27 2733.4,1767.35 Q33.1@2733.4,1645.35
LED_GPIO_21: Q30.1 Q34.1 R76.1 U4.25 | length 2100.4
  Top Layer w8: v1(1566,1319) 1566.27,1319.27 U4.25@1614.65,1319.27
  Top Layer w12: v1(2356,1468) 2618.5,1468 2726.5,1576 v1(2726.5,2024.5)
  Bottom Layer w8: v1(1566,1319) 1566,1355.48 1616.52,1406 1749,1406 1762.81,1419.81 2273.32,1419.81 2321.5,1468 v1(2356,1468)
  Bottom Layer w12: R76.1@2598.21,2220.5 2710.5,2220.5 2726.41,2204.59 Q34.1@2726.41,2055.18 ; v1@2726,2023.33 Q34.1@2726,2054
LED_GPIO_22: Q31.1 Q35.1 R77.1 U4.26 | length 1394.2
  Top Layer w8: U4.26@1614.65,1299.58 1667.42,1299.58 1698.81,1268.19 1741.66,1268.19 1781,1307.53 v1(1781,1328)
  Bottom Layer w8: v1(1781,1328) 1781,1329.26 1841.55,1389.81 2346.81,1389.81 2388,1431
  Bottom Layer w12: 2388,1431 2461.4,1504.4 Q35.1@2461.4,1640.35
  Bottom Layer w20: R77.1@2330.99,1812.18 2330.99,1811.68 2436.99,1811.68 2461.4,1787.27 Q35.1@2461.4,1640.35
LED_GPIO_23: Q32.1 Q36.1 R78.1 U4.27 | length 1863.8
  Top Layer w8: U4.27@1614.65,1279.9 1665.89,1279.9 1692.6,1253.19 1754.19,1253.19 1812,1311 v1(1812,1328)
  Top Layer w12: v1(2450.5,2021.5) 2450.5,1542.5 v1(2493,1500)
  Bottom Layer w8: v1(1812,1328) 1858.81,1374.81 2367.81,1374.81 2414,1421
  Bottom Layer w12: R78.1@2321.82,2220.5 2436.5,2220.5 2450.76,2206.24 Q36.1@2450.76,2055.18 Q36.1@2450.76,2048.67 ; 2414,1421 v1(2493,1500) ; v1@2450,2020.33 Q36.1@2450,2051
LED_GPIO_24: Q39.1 Q41.1 R85.1 U4.20 | length 937.7
  Top Layer w8: v1(1740.47,1438) 1750.47,1428 U4.20@1750.47,1376.35
  Bottom Layer w8: v1(1740.47,1438) 2074,1438 2126,1490
  Bottom Layer w12: 2126,1490 2186.86,1550.86 Q41.1@2186.86,1641.67
  Bottom Layer w20: R85.1@2056.45,1813.5 2056.45,1813 2162.45,1813 2186.86,1788.59 Q39.1@2186.86,1763.67 Q41.1@2186.86,1641.67
LED_GPIO_25: Q40.1 Q42.1 R86.1 U4.37 | length 2514.7
  Top Layer w10: v1@1671,854 1671,850.73 1671.73,850 U4.37@1671.73,1045.65 ; 2173.91,1583 2173.91,1528.13 2237,1465.04 2237,1441 2417,1261 v1(2417,893)
  Top Layer w12: 2173.91,1583 v1(2173.91,2021.5)
  Bottom Layer w10: v1(1671,847) 2292,847 2338,893 v1(2417,893)
  Bottom Layer w12: R86.1@2044.72,2224.5 2154.5,2224.5 2174.41,2204.59 Q42.1@2174.41,2055.18 2174.41,2052.67 v1@2174.41,2022
LED_GPIO_31: Q47.1 Q51.1 R94.1 U4.45 | length 960.2
  Top Layer w8: U4.45@1829.21,1045.65 1829.21,1085.57 1810,1104.79 1810,1287 1859.84,1336.84 1904.84,1336.84 1911,1343 v1(1911,1468)
  Bottom Layer w12: Q51.1@1898.02,1636.35 1898.02,1602 1911,1589.02 v1(1911,1468)
  Bottom Layer w20: R94.1@1767.61,1808.17 1767.61,1807.67 1873.61,1807.67 1898.02,1783.27 Q51.1@1898.02,1636.35
LED_GPIO_32: Q48.1 Q52.1 R95.1 U4.39 | length 2320.1
  Top Layer w10: U4.39@1711.1,1045.65 v1(1711.1,1090.9) ; 1900.1,1671.32 1900.1,1658.57 2043.67,1515 2163,1515 2220,1458 2220,1014 2199,993 v1(2199,893)
  Top Layer w12: 1900.1,1671.32 v1(1900.1,2017.17)
  Bottom Layer w10: v1(1711.1,1090.9) 1782,1020 1782,942 1831,893 v1(2199,893)
  Bottom Layer w12: R95.1@1769.17,2220.17 1884.38,2220.17 1899.6,2204.96 Q52.1@1899.6,2055.18 v1@1899.6,2017.68
LED_GPIO_33: Q49.1 Q53.1 R96.1 U4.40 | length 1817.3
  Top Layer w10: v1(1719,956) 1720,955 1720,952 1730.79,962.79 U4.40@1730.79,1045.65
  Top Layer w12: v1(1395,1806) 1395,1644 1237,1486 1237,1024 1305,956 v1(1424,956)
  Bottom Layer w10: v1(1424,956) v1(1719,956)
  Bottom Layer w12: v1(1395,1806) 1395.26,1806.26 R96.1@1464.12,1806.26
  Bottom Layer w20: R96.1@1464.52,1806.26 1464.52,1805.76 1570.52,1805.76 1594.92,1781.35 Q53.1@1594.92,1634.44
LED_GPIO_34: Q50.1 Q54.1 R97.1 U4.46 | length 1752
  Top Layer w8: U4.46@1848.9,1045.65 1848.9,1087.1 1825,1111 1825,1279.16 1861.84,1316 1882,1316 1881,1315 v1(1881,1313) ; v1(1942,1468) 1942,1363.24 1953.24,1352 v1(1970,1352)
  Top Layer w10: 1721.19,1624 1901,1624 v1(1942,1583) 1940,1581 v1@1940,1578
  Top Layer w12: v1(1596.52,2017.26) 1596.52,1672.48 1645,1624 1721.19,1624
  Bottom Layer w8: v1@1881,1311 v1(1881,1313) 1881,1336 1897,1352 v1(1970,1352)
  Bottom Layer w12: R97.1@1464.84,2220.26 1580.06,2220.26 1596.02,2204.3 Q54.1@1596.02,2055.18 ; Q54.1@1597.01,2057.01 1597.01,2017.51 v1@1597.27,2017.26 ; v1(1942,1468) v1(1942,1583)
LED_GPIO_35: Q59.1 Q63.1 R106.1 U4.21 | length 929.2
  Top Layer w8: v1(1604,1438) 1702,1438 1730.79,1409.21 U4.21@1730.79,1376.35
  Bottom Layer w12: Q63.1@1290.83,1640.36 1290.83,1516.17 1369,1438 v1(1604,1438)
  Bottom Layer w20: R106.1@1160.43,1812.18 1160.43,1811.68 1266.43,1811.68 1290.83,1787.27 Q59.1@1290.83,1762.36 Q63.1@1290.83,1640.36
LED_GPIO_41: Q60.1 Q64.1 R107.1 U4.42 | length 2429.9
  Top Layer w10: v1@1746,899 v1(1746,897) 1770.16,921.16 U4.42@1770.16,1045.65
  Top Layer w12: v1(994,1189) 1284.19,898.81 1379.19,898.81 v1(1380,898) ; v1(1202,1189) 1202,1496 1290.91,1584.91 v1(1290.91,2015.18)
  Bottom Layer w10: v1(1380,898) 1381,897 v1(1746,897)
  Bottom Layer w12: v1(994,1189) v1(1202,1189) ; R107.1@1158.48,2218.18 1273.7,2218.18 1290.4,2201.47 Q60.1@1290.4,2177.18 Q64.1@1290.4,2055.18 1290.65,2054.93 1290.65,2015.43 v1(1290.91,2015.18)
LED_GPIO_42: Q61.1 Q65.1 R108.1 U4.43 | length 1889.3
  Top Layer w10: v1@1764,871 v1(1764,872) 1764,873 1789.84,898.84 U4.43@1789.84,1045.65
  Top Layer w12: v1@941,1433 941,1196 1263,874 v1(1348,874)
  Bottom Layer w10: v1@1348,872 1349,871 v1@1764,871
  Bottom Layer w12: v1(941,1442) 995.41,1496.41 Q65.1@995.41,1641.68
  Bottom Layer w20: R108.1@865,1813.5 865,1813 971,1813 995.41,1788.59 Q61.1@995.41,1763.68 Q65.1@995.41,1641.68
LED_GPIO_43: Q62.1 Q66.1 R109.1 U4.41 | length 2102.1
  Top Layer w10: v1(1729,925) 1750.47,946.47 U4.41@1750.47,1045.65
  Top Layer w12: v1(997.67,2018.5) 997.67,1228.33 1301,925 v1(1406,925)
  Bottom Layer w10: v1(1406,925) v1(1729,925)
  Bottom Layer w12: R109.1@864.5,2221.5 980.5,2221.5 997.16,2204.84 Q66.1@997.16,2055.18 997.16,2049.67 v1@997.16,2019
LED_GPIO_44: Q69.1 Q71.1 R116.1 U4.17 | length 1698.4
  Top Layer w8: v1(1490,1402) 1490,1444 1537,1491 1770,1491 1809.53,1451.47 U4.17@1809.53,1376.35
  Bottom Layer w12: 697.4,1606 697.4,1584.6 880,1402 v1(1490,1402)
  Bottom Layer w20: R116.1@566.99,1826.18 566.99,1825.68 672.99,1825.68 697.4,1801.27 Q69.1@697.4,1776.35 Q71.1@697.4,1654.35 697.4,1606
LED_GPIO_45: Q70.1 Q72.1 R117.1 U4.29 | length 2018.2
  Top Layer w12: v1(699,1240.53) v1(699,2024) ; v1(1517,1240.53) U4.29@1614.65,1240.53
  Bottom Layer w12: R117.1@568.09,2226.5 674.09,2226.5 698.5,2202.09 Q70.1@698.5,2177.18 Q72.1@698.5,2055.18 698.5,2024.5 v1(699,2024) ; v1(699,1240.53) 699.28,1240.81 1516.72,1240.81 v1(1517,1240.53)
M_VDD: C25.2 CU1.1 CU2.1 CU3.1 CU4.1 CU5.1 CU6.1 CU7.1 FB1.2 J1.1 Q73.3 Q74.3 Q75.3 Q76.3 R3.2 RU1.2 RU2.2 U4.1 U4.9 U4.24 U4.36 U4.48 | length 5300.6
  Top Layer w8: v1(1638,1376) 1638,1409 1649,1420 1663,1420 1671.73,1411.27 U4.24@1671.73,1376.35
  Top Layer w10: U4.36@1614.65,1102.73 1671.73,1102.73 v1(1672.92,1103.92)
  Top Layer w12: v1(1892,1261) 1892.79,1260.21 U4.9@1945.35,1260.21
  Top Layer w20: v1(1892,1261) 1855,1224 1855,1124 v1(1851,1120) 1891,1120 1905,1106 1905,1090.9 ; v1(2188,1057) v1(2188,1262) ; v1(2481,1014) 2629,1014 2745,898 v1(2827,898)
  Top Layer w25: -86,223 v1(371.28,223) ; -82,402 -70.99,390.99 Q73.3@-46.82,390.99 ; -82,1575 -70.18,1586.82 Q76.3@-45.1,1586.82 ; v1(526,253) v1(677,253)
  Bottom Layer w12: 1837,1118.46 1869.62,1118.46 1886.08,1102 1887.08,1103 1887.08,1105 1887.08,1108.08 CU5.1@1890,1111 ; v1(1892,1261) 1893.58,1262.58 CU7.1@1945.35,1262.58 2188,1262.58 2219.5,1262.58 2244.09,1238 RU1.2@2295.5,1238 ; CU4.1@1943.25,1103 CU4.1@1945.35,1105.1
  Bottom Layer w20: CU2.1@1614.65,1103.92 v1(1672.92,1103.92) ; v1(1638,1376) 1672.56,1376 CU6.1@1672.92,1376.35 CU1.1@1672.92,1327 v1(1672.92,1103.92) ; v1(1851,1120) 1689,1120 v1(1672.92,1103.92) ; CU3.1@1887.08,1045.65 CU5.1@1887.08,1103 ; CU5.1@1887.08,1105 CU4.1@1943.25,1105 ; v1@1891.5,1261.5 v1(1892,1261) ; 1921,675 1921.1,675.1 ; 1984,618 1986,620 ; v1(2188,1057) 2188.69,1056.31 2219.86,1056.31 2297.5,978.67 R3.2@2297.5,950 2417,950 v1(2481,1014) ; v1(2827,898) 3006,898 3068,836 RU2.2@3068,799.21
  Bottom Layer w25: v1(371.28,223) 496,223 v1(526,253) ; v1(677,253) 677,331 893,547 v1(914,547) ; 2000.94,614.5 C25.2@2038.94,614.5 ; 2009,673 2011,675 2399,675 2523.21,799.21 RU2.2@3068,799.21
  other v1: 1631,666 1631,692
MCU_5V: C1.1 C10.1 CF1.1 D1.K D2.K J4.1 R1.2 U1.3 | length 804.4
  Top Layer w25: v1(858,604) v1(1124,604) ; R1.2@2342.81,389.5 2342.81,679.78
  Bottom Layer w25: v1(677,442) 839,604 v1(858,604)
  other v1: 1468,304 1494,304
NetC2_1: C2.1 U1.6
NetC13_1: C13.1 Q1.1 Q2.2 R7.2 R8.2 R9.1
NetC14_1: C14.1 R8.1
NetC14_2: C14.2 F1.1 Q1.3
NetC17_2: C17.2 Q2.1 R6.2 R10.2
NetCF5_1: CF5.1 U2.6
NetLED1_1: LED1.1 R3.1 | length 75.5
  Top Layer w12: v1(2227,952) LED1.1@2267,952
  Bottom Layer w12: v1(2227,952) 2227,950 R3.1@2260.5,950
NetLED2_1: LED2.1 R58.2 | length 91.2
  Top Layer w12: LED2.1@2266,1103 2266.5,1102.5 v1(2266.5,1057)
  Bottom Layer w12: v1(2266.5,1057) R58.2@2266.5,1102
NetLED3_2: LED3.2 R67.1 | length 1086.2
  Top Layer w12: v1(2879,1237) 2881,1237 2973,1329 2973,2106 2898,2181 LED3.2@2898,2219.69 LED3.2@2898,2221
  Bottom Layer w12: v1(2879,1237) 2879,1266.18 R67.1@2880.32,1267.5
NetLED4_2: LED4.2 R68.1 | length 1647.8
  Top Layer w12: v1(2605,1235) 2606,1235 2647,1194 2893.94,1194 2999,1299.06 2999,2205.06 2943.06,2261 2815,2261 2798.11,2244.11 LED4.2@2798.11,2222.65 LED4.2@2798.11,2221
  Bottom Layer w12: v1(2605,1235) 2605,1266.07 2606,1267.07 R68.1@2605.58,1267.5
NetLED5_2: LED5.2 R69.1 | length 803
  Top Layer w12: LED5.2@2698.22,2221 LED5.2@2698.22,2219.65 2698.22,2184.78 2737,2146 2888,2146 2947,2087 2947,1741.68 2880.32,1675 v1(2877,1675)
  Bottom Layer w12: v1(2877,1675) 2877,1704.86 R69.1@2880.32,1708.18
NetLED6_2: LED6.2 R70.1 | length 389.5
  Top Layer w12: LED6.2@2598.33,2221 2598.33,2181.67 2702,2078 v1(2872,2078)
  Bottom Layer w12: v1(2872,2078) 2872,2110.23 R70.1@2872.95,2111.18
NetLED7_2: LED7.2 R79.1 | length 706.3
  Top Layer w12: LED7.2@2498.44,2221 2498.44,2188.56 2543,2144 2593,2144 2666,2071 2666,1735.42 v1(2605.58,1675) v1@2609,1675
  Bottom Layer w12: v1(2605.58,1675) R79.1@2605.58,1708.18
NetLED8_2: LED8.2 R80.1 | length 318.2
  Top Layer w12: LED8.2@2398.56,2221 2398.56,2176.44 2496.9,2078.1 v1(2598,2078.1)
  Bottom Layer w12: v1(2598,2078.1) 2598,2111.28 R80.1@2598.21,2111.5
NetLED9_2: LED9.2 R81.1 | length 629.9
  Top Layer w12: LED9.2@2298.67,2221 2298.67,2175.33 2371,2103 2371,1708.17 v1(2332.83,1670)
  Bottom Layer w12: v1(2332.83,1670) R81.1@2332.83,1703.18
NetLED10_2: LED10.2 R82.1 | length 243.3
  Top Layer w12: LED10.2@2198.78,2221 LED10.2@2198.78,2220.15 2198.78,2173.22 2293.68,2078.32 v1(2321.82,2078.32)
  Bottom Layer w12: v1(2321.82,2078.32) R82.1@2321.82,2111.5
NetLED11_2: LED11.2 R87.1 | length 600
  Top Layer w12: v1(2057.55,1671.32) 2098.89,1712.66 LED11.2@2098.89,2221
  Bottom Layer w12: v1(2057.55,1671.32) R87.1@2057.55,1704.5
NetLED12_2: LED12.2 R88.1 | length 190.8
  Top Layer w12: LED12.2@1999,2221 1999,2128.04 v1(2044.72,2082.32)
  Bottom Layer w12: v1(2044.72,2082.32) R88.1@2044.72,2115.5
NetLED13_2: LED13.2 R98.1 | length 876.9
  Top Layer w10: LED13.2@1729,2220 1729,2249 1718,2260 1593,2260 1577,2244 1577,2179 1767,1989 v1(1767,1669)
  Bottom Layer w10: v1(1767,1669) R98.1@1767,1700
NetLED14_2: LED14.2 R99.1 | length 259.2
  Top Layer w12: LED14.2@1628.89,2220 1628.89,2174.11 1725,2078 v1(1769.17,2078)
  Bottom Layer w12: v1(1769.17,2078) R99.1@1769.17,2111.17
NetLED15_2: LED15.2 R100.1 | length 838.6
  Top Layer w10: v1(1464,1662) 1465,1663 1465,2038 1379,2124 1379,2248 1388,2257 1517,2257 1528.78,2245.22 LED15.2@1528.78,2220
  Bottom Layer w10: v1(1464,1662) R100.1@1464,1695
NetLED16_2: LED16.2 R101.1 | length 184.7
  Top Layer w10: LED16.2@1428.67,2220 1428.67,2119.33 v1(1466,2082)
  Bottom Layer w10: R101.1@1463,2112 1466,2109 v1(1466,2082)
NetLED17_2: LED17.2 R110.1 | length 823.1
  Top Layer w10: v1(1157,1673) 1130,1700 1130,2089 1178,2137 1178,2250 1188,2260 1312,2260 1328.56,2243.44 LED17.2@1328.56,2220
  Bottom Layer w10: v1(1157,1673) R110.1@1157,1703
NetLED18_2: LED18.2 R111.1 | length 210.7
  Top Layer w12: v1(1158,2083) 1189,2083 1228.44,2122.44 LED18.2@1228.44,2220
  Bottom Layer w12: v1(1158,2083) 1158,2108.69 R111.1@1158.48,2109.18
NetLED19_2: LED19.2 R112.1 | length 926.3
  Top Layer w12: v1(862,1675) 863,1676 832,1707 832,2100 845,2113 954,2113 978,2137 978,2243 995,2260 1117,2260 1128.33,2248.67 LED19.2@1128.33,2220.15 LED19.2@1128.33,2220
  Bottom Layer w12: v1(862,1675) 862,1703.38 R112.1@863.12,1704.5
NetLED20_2: LED20.2 R113.1 | length 314.5
  Top Layer w10: v1(863.12,2087) 863.12,2088.38 1011.66,2088.38 1028.22,2104.94 LED20.2@1028.22,2220
  Bottom Layer w10: v1(863.12,2087) 863.12,2111.12 R113.1@864.5,2112.5
NetLED21_2: LED21.2 R118.1 | length 994.1
  Top Layer w12: v1(564,1688) 564,1949 540.28,1972.72 540.28,2200.28 598,2258 916,2258 928.11,2245.89 LED21.2@928.11,2220
  Bottom Layer w12: v1(564,1688) 564,1716.81 R118.1@564.37,1717.18
NetLED22_2: LED22.2 R119.1 | length 403.8
  Top Layer w10: v1(565.09,2090) 565.09,2192.09 593,2220 LED22.2@828,2220
  Bottom Layer w10: v1@565.09,2090.73 R119.1@565.09,2118
NetQ13_1: Q13.1 Q17.3 R59.1 | length 114.5
  Bottom Layer w20: R59.1@2876.49,1413.5 2990.99,1413.5
NetQ14_1: Q14.1 Q18.3 R60.1 | length 114.5
  Bottom Layer w20: R60.1@2602.49,1413.5 2716.99,1413.5
NetQ15_1: Q15.1 Q19.3 R61.1 | length 114.5
  Bottom Layer w20: R61.1@2876.99,1854.18 2991.49,1854.18
NetQ16_1: Q16.1 Q20.3 R62.1 | length 114.5
  Bottom Layer w20: R62.1@2869.99,2257.18 2984.49,2257.18
NetQ21_3: Q21.3 R67.2 | length 389.8
  Bottom Layer w10: R67.2@2880.32,1304.5 2856.62,1304.5 2841.44,1289.32 2841.44,1195.56 2868.5,1168.5 2953.5,1168.5 2970,1185 Q21.3@2970,1289.32